# Altium PCB 0060631C.PcbDoc (part 3 of 7)
Units mil, origin at the board's own origin, x right, y up, seen from the top; angles counter-clockwise.
Board outline 5480 x 8249 mil, 6 copper layers (Top Layer, Mid-Layer 1, Mid-Layer 2, Internal Plane 1, Internal Plane 2, Bottom Layer); 514 components, 269 nets, 1375 pads, 1334 vias.
Unrouted connection lines stored in the file: 126.
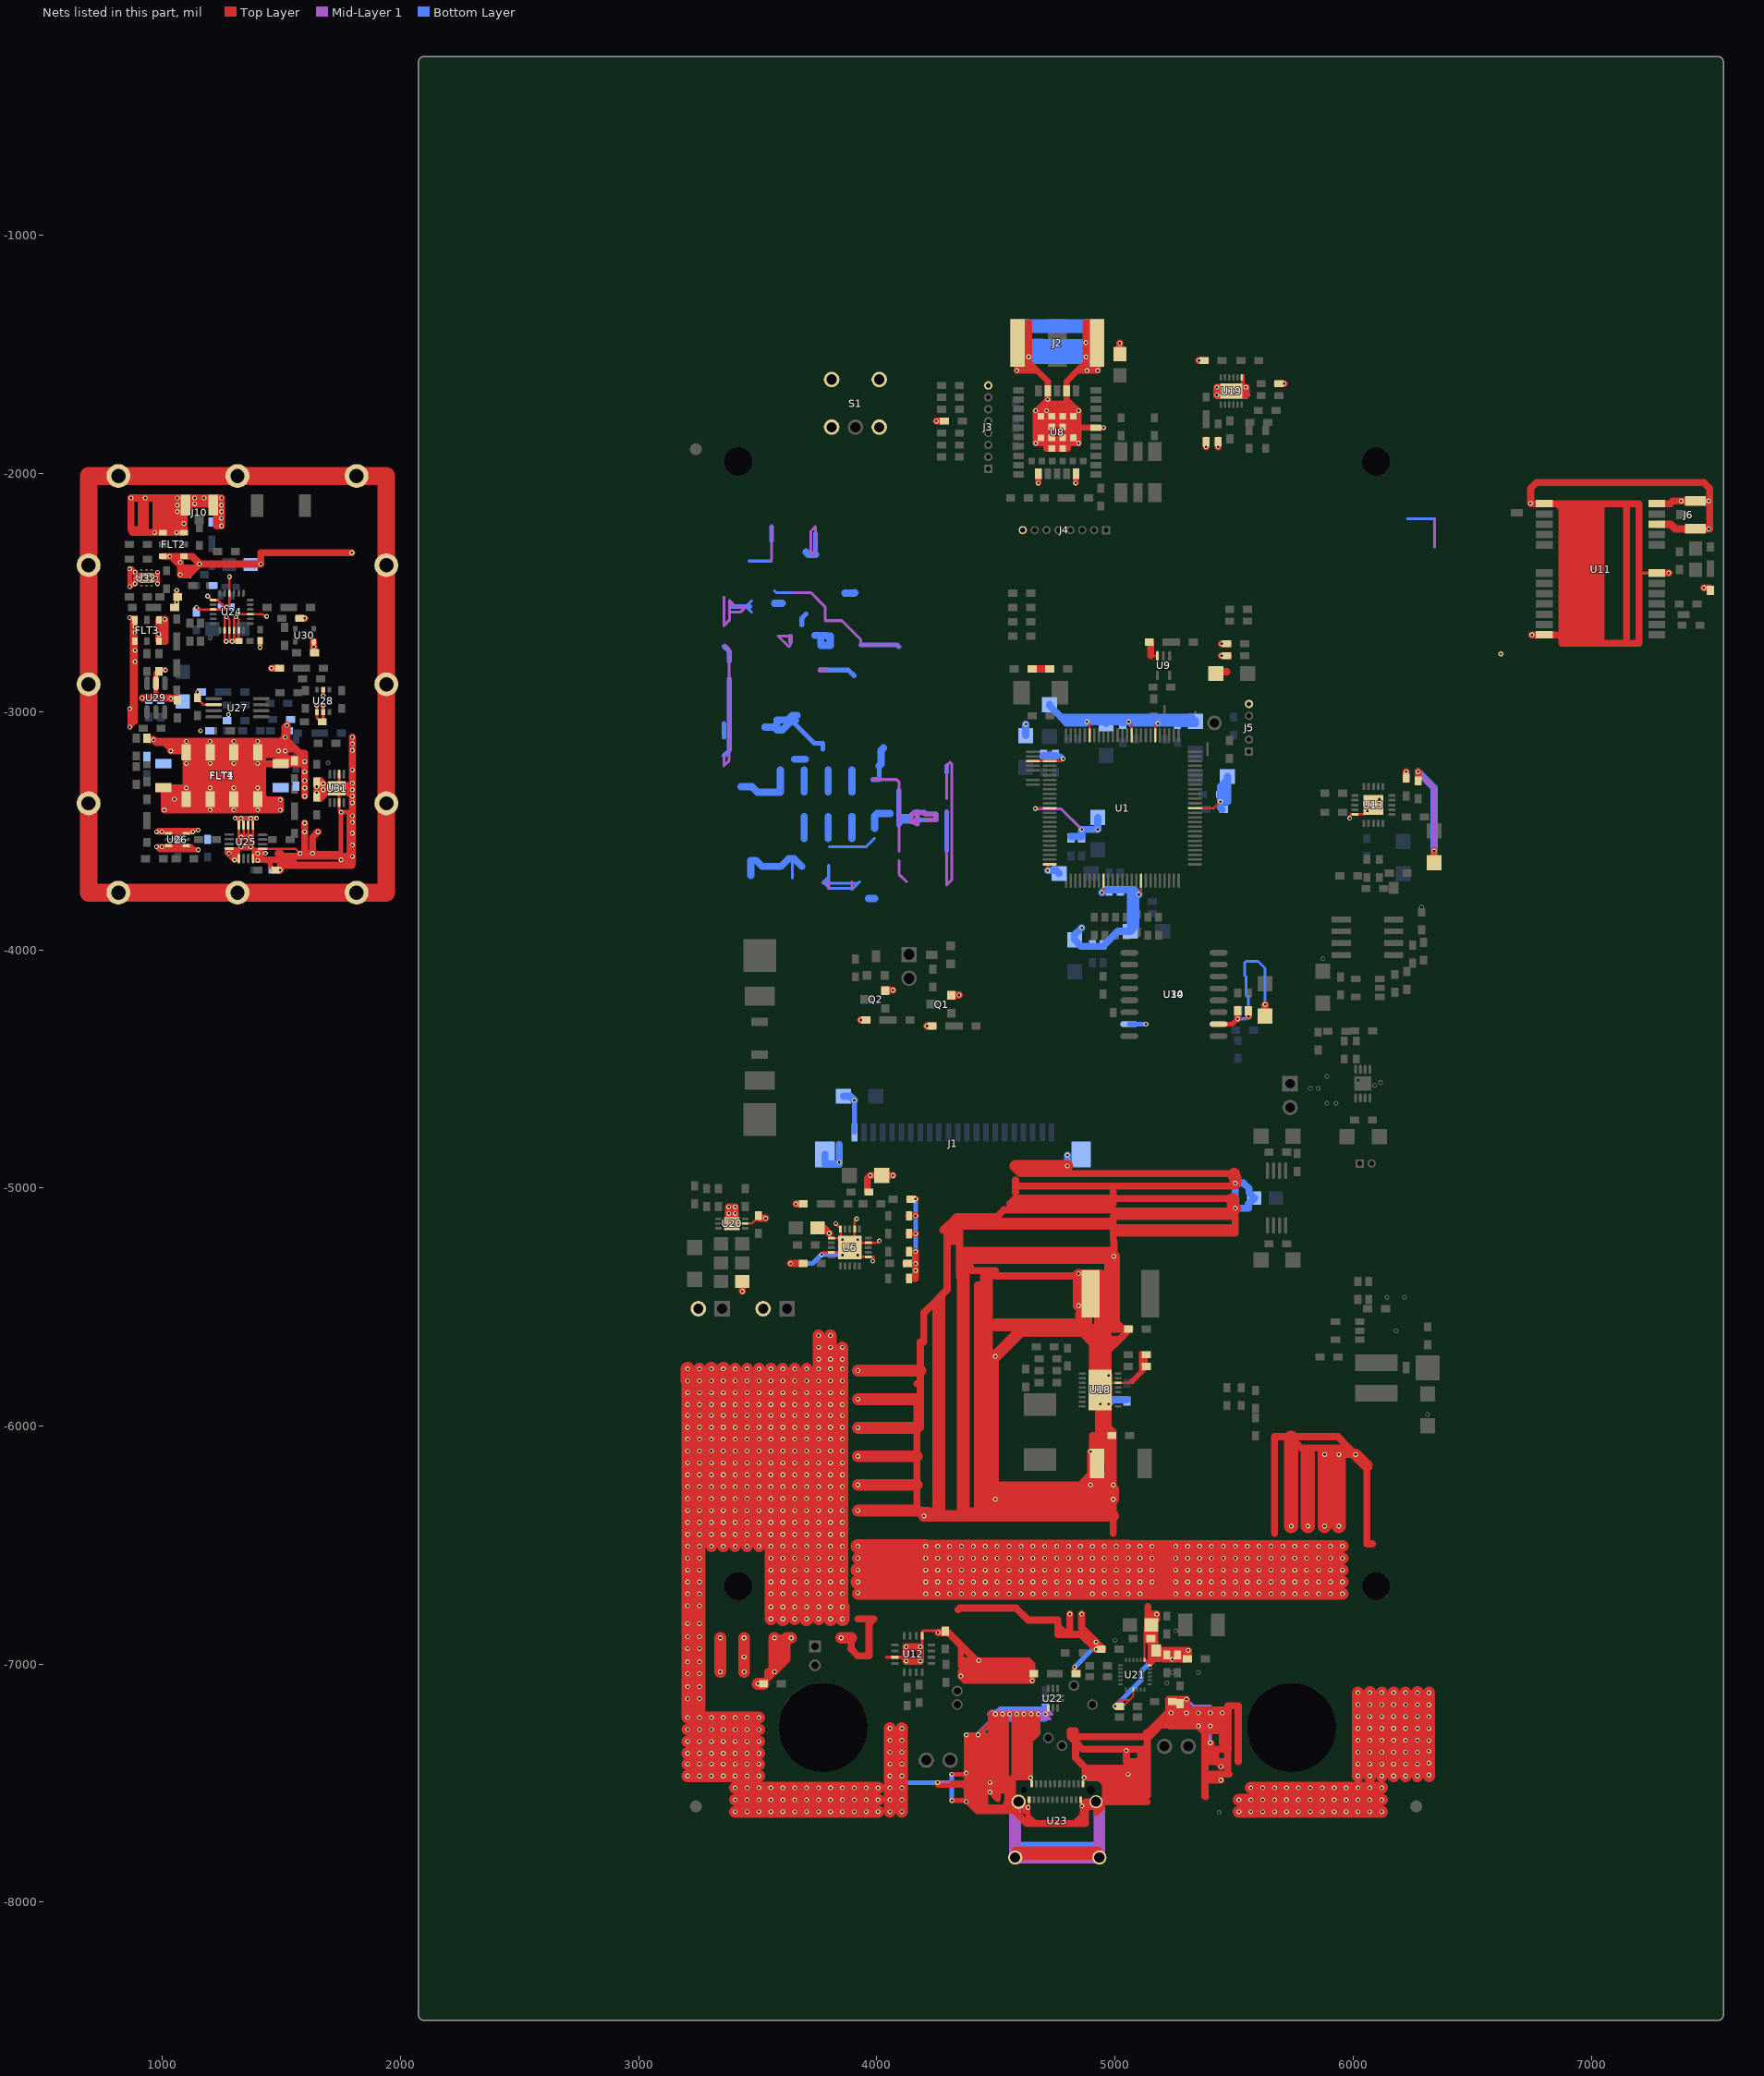
[diagram p7: the nets of this part, all layers, seen from the top]

## Via types
v1: diameter 20, hole 10, Top Layer to Bottom Layer, 1334 vias

## Nets (pads, with @x,y where several pads share a name; then routed paths per layer and width w, separated by ;. In a path a pad name is that pad's centre, name@x,y a point inside that pad or via, vN(x,y) a via of type N, cw(c..) or ccw(c..) an arc to the next point about the centre after c; other vN are vias at no path point) (continued)
GND: C1.2 C2.2 C3.2 C4.2 C5.2 C6.2 C7.2 C8.2 C9.2 C10.2 C11.2 C12.2 C13.2 C14.2 C15.2 C16.2 C17.2 C18.2 C19.2 C20.2 C21.2 C22.2 C23.2 C24.2 C25.2 C26.2 C27.2 C28.2 C29.2 C30.2 C31.2 C32.2 C33.2 C34.2 C35.2 C36.2 C37.2 C38.2 C39.2 C40.2 C41.2 C47.2 C57.2 C59.2 C62.2 C63.2 C64.2 C65.2 C66.2 C67.2 C69.2 C70.2 C71.2 C72.2 C73.2 C74.2 C75.2 C76.2 C78.2 C79.2 C81.1 C82.2 C83.2 C84.2 C88.2 C92.2 C96.2 C97.1 C98.2 C100.2 C101.1 C102.1 C103.1 C104.2 C105.2 C108.1 C110.2 C111.1 C112.1 C113.1 C116.2 C117.2 C118.2 C119.2 C120.2 C121.2 C122.2 C123.2 C124.2 C129.2 C130.2 C131.2 D1.2 D7.2 FLT1.1 FLT1.2 FLT1.3 FLT1.4 FLT1.6 FLT1.7 FLT1.8 FLT1.9 FLT1.10 FLT1.12 FLT2.1 FLT2.3 FLT2.4 FLT2.6 FLT3.1 FLT3.3 FLT3.4 FLT3.6 FLT4.1 FLT4.2 FLT4.3 FLT4.4 FLT4.6 FLT4.7 FLT4.8 FLT4.9 FLT4.10 FLT4.12 J1.22 J1.23 J1.24 J2.2 J2.3 J2.4 J2.5 J3.8 J4.8 J5.5 J6.2 J6.3 J8.2 J9.2 J10.2 J10.3 L4.2 Q1.2 Q2.2 R4.2 R7.2 R20.2 R24.1 R27.2 R58.2 R64.2 R65.2 R68.2 R76.2 R78.2 R79.2 R87.2 R98.1 R99.1 R104.1 R107.2 R109.2 R113.2 R118.2 R126.2 R127.1 S1.1 S1.3 S1.4 S1.5 TestPoint1.TestPoint1 TestPoint2.TestPoint2 TestPoint3.TestPoint3 TestPoint4.TestPoint4 TestPoint5.TestPoint5 TestPoint6.TestPoint6 TestPoint7.TestPoint7 TestPoint8.TestPoint8 TestPoint9.TestPoint9 TestPoint10.TestPoint10 TestPoint11.TestPoint11 TestPoint12.TestPoint12 TP5.1 TP15.1 U1.13 U1.31 U1.36 U1.45 U1.53 U1.63 U1.75 U1.84 U1.92 U2.2 U3.2 U4.2 U5.2 U6.1 U6.4 U6.11 U6.14 U6.17 U6.20 U6.21 U8.6 U8.12 U8.14 U8.26 U8.30 U8.37 U8.38 U8.39 U8.40 U8.41 U8.42 U8.43 U8.44 U8.45 U8.46 U8.47 U8.48 U9.3 U10.10 U11.7 U11.10 U11.12 U11.13 U11.24 U12.3 U12.13 U13.5 U13.21 U18.6 U18.17 U19.1 U19.13 U20.2 U20.7 U21.9 U21.18 U21.19 U22.8 U23.A1 U23.A12 U23.B1 U23.B12 U23.S1 U23.S2 U23.S3 U23.S4 U24.1 U24.3 U24.8 U24.9 U24.10 U24.11 U24.15 U24.22 U25.1 U25.5 U25.6 U25.7 U25.8 U25.12 U25.13 U25.16 U26.1 U26.3 U26.4 U26.6 U26.7 U27.2 U28.1 U28.2 U28.5 U29.2 U30.2 U31.3 U31.6 U31.9 U32.7 U34.10 ~FV23.FV ~FV24.FV ~FV25.FV ~FV26.FV ~FV27.FV ~FV28.FV ~FV29.FV ~FV30.FV ~FV31.FV ~FV32.FV ~FV33.FV ~FV34.FV ~FV35.FV ~FV36.FV ~FV37.FV ~FV38.FV ~FV39.FV ~FV40.FV ~FV41.FV ~FV42.FV ~FV43.FV ~FV44.FV ~FV45.FV ~FV46.FV ~FV47.FV ~FV48.FV ~FV49.FV ~FV50.FV ~FV51.FV ~FV52.FV ~FV53.FV ~FV54.FV ~FV55.FV ~FV56.FV ~FV57.FV ~FV58.FV ~FV59.FV ~FV60.FV ~FV61.FV ~FV62.FV ~FV63.FV ~FV64.FV ~FV65.FV ~FV66.FV ~FV67.FV ~FV68.FV ~FV69.FV ~FV70.FV ~FV71.FV ~FV72.FV ~FV73.FV ~FV74.FV ~FV75.FV ~FV76.FV ~FV77.FV ~FV78.FV ~FV79.FV ~FV80.FV ~FV81.FV ~FV82.FV ~FV83.FV ~FV84.FV ~FV85.FV ~FV86.FV ~FV87.FV ~FV88.FV ~FV89.FV ~FV90.FV ~FV91.FV ~FV92.FV ~FV93.FV ~FV94.FV ~FV95.FV ~FV96.FV ~FV97.FV ~FV98.FV ~FV99.FV ~FV100.FV ~FV101.FV ~FV102.FV ~FV103.FV ~FV104.FV ~FV105.FV ~FV106.FV ~FV107.FV ~FV108.FV ~FV109.FV ~FV110.FV ~FV111.FV ~FV112.FV ~FV113.FV ~FV114.FV ~FV117.FV ~FV118.FV ~FV119.FV ~FV120.FV ~FV121.FV | length 158276.6
  Top Layer w7: U21.9@5076.6,-7106.6 5076.6,-7136.1 5062.5,-7150.2 ; C67.2@5137.5,-6850.2 5123.9,-6863.8 5123.9,-6911.3 ; C66.2@5145,-6892.7 5142.5,-6892.7 5137.5,-6897.7 5123.9,-6911.3 ; U21.18@5146.5,-7005.2 5152.5,-7005.2 5158.7,-6999 ; C67.2@5162.5,-6845.2 5177.5,-6860.2 5177.5,-6905.2 5180,-6907.7 TP15.1@5180,-6934.1 ; 5167.5,-6980.2 5167.5,-6990.2 5161.3,-6996.4 ; TP15.1@5172.5,-6942.7 5174.8,-6939.3 TP15.1@5180,-6934.1 ; TP15.1@5177.5,-6942.7 5180,-6938.5 TP15.1@5185,-6930.2 ; 5190,-6980.2 5190,-6955.2 5190,-6942.7 5190,-6917.7 5185,-6924.8 TP15.1@5185,-6930.2 ; 5196.2,-6986.4 5217.5,-6986.4 ; C69.2@5220,-6965.2 5217.5,-6967.7 5217.5,-6981.5 ; v1(5240,-6980.2) C70.2@5265,-6980.2 ; C70.2@5260,-6965.2 5265,-6970.2 C70.2@5265,-6980.2 ; C73.2@5307.5,-6967.7 5307.5,-6972.7 C73.2@5298.7,-6981.5 ; C73.2@5310,-6977.7 5297.5,-6990.2 C73.2@5290,-6990.2 ; 5062.5,-7150.2 5015,-7150.2 5015,-7167.7 5025,-7177.7 5035,-7177.7 5062.5,-7150.2 ; U21.19@5123.9,-6976.6 5143.7,-6996.4 ; U21.19@5123.9,-6976.6 5123.9,-6911.3 ; U21.19@5123.9,-6976.6 U21.19@5123.9,-6982.6 5123.9,-6984.1 5138.8,-6999 5143.7,-6999 ; 5143.7,-6999 5158.7,-6999 ; 5143.7,-6999 5143.7,-6996.4 ; 5143.7,-6996.4 5161.3,-6996.4 ; 5158.7,-6999 5161.3,-6996.4 ; TP15.1@5180,-6934.1 5183.9,-6930.2 TP15.1@5185,-6930.2 ; 5217.5,-6990.2 5265,-6990.2 ; 5217.5,-6990.2 5217.5,-6986.4 ; 5217.5,-6990.2 5198.7,-6990.2 5190,-6981.5 5217.5,-6981.5 ; 5217.5,-6986.4 5217.5,-6981.5 ; 5217.5,-6981.5 5265,-6981.5 ; 5265,-6990.2 5265,-6981.5 ; 5265,-6990.2 C73.2@5290,-6990.2 ; 5265,-6981.5 C70.2@5265,-6980.2 ; 5265,-6981.5 C73.2@5298.7,-6981.5 ; C73.2@5290,-6990.2 C73.2@5298.7,-6981.5
  Top Layer w9: U18.17@4937.4,-5848.6 4947.4,-5838.6 4966.9,-5819.1 4969.9,-5819.1 U18.6@5012.4,-5819.1 5055.8,-5819.1 ; R65.2@5120,-5745 R64.2@5120,-5705 ; U19.13@5532.5,-1637.5 U19.1@5532.5,-1596 5532.5,-1587.5 5540,-1587.5 ~FV76.FV@5540,-1637.5 ; 5055.8,-5819.1 5065.8,-5819.1 ; 5055.8,-5819.1 5097.4,-5777.5 5097.5,-5777.5 5104.9,-5770.1 ; 5065.8,-5819.1 5075.9,-5819.1 5132.5,-5762.5 R65.2@5132.5,-5752.4 ; 5065.8,-5819.1 5104.9,-5780 ; 5104.9,-5780 5128.7,-5756.2 5126.58,-5752.64 R65.2@5125,-5750 ; 5104.9,-5780 5104.9,-5770.1 ; 5104.9,-5770.1 5104.9,-5690 5115,-5690 5125,-5700 R64.2@5126.3,-5701.3 ; 5104.9,-5770.1 R65.2@5125,-5750 ; R65.2@5125,-5750 5130.44,-5751.74 R65.2@5132.5,-5752.4 ; R65.2@5125,-5750 5125,-5702.6 R64.2@5126.3,-5701.3 ; R64.2@5126.3,-5701.3 5132.5,-5707.5 R65.2@5132.5,-5752.4
  Top Layer w10: v1(1142.5,-2562.5) 1150.7,-2570.7 U24.3@1212.5,-2570.7 1259.8,-2570.7 v1(1269,-2561.5) ; C118.2@1147.5,-2947.5 1170.6,-2970.6 U27.2@1215,-2970.6 ; v1(1190,-2515) 1206.3,-2531.3 U24.1@1212.5,-2531.3 1232.3,-2531.3 1262.5,-2561.5 v1(1269,-2561.5) ; v1(1281.5,-2433.5) 1280.8,-2434.2 U24.22@1280.8,-2502.5 1280.8,-2549.7 v1(1269,-2561.5) ; 1312.5,-3626.8 1312.5,-3585 ; C121.2@1320.3,-2702.5 C121.2@1320.2,-2702.4 ; U25.13@1320.7,-3616.9 1320.7,-3585 ; 1340.4,-3527.5 1340.4,-3517.1 ; ~FV41.FV@1360.1,-3527.5 1360.1,-3517.6 ; v1@1360.1,-3447.6 U25.6@1360.1,-3476.5 1360.1,-3517.6 ; v1(1370,-3447.5) 1379.8,-3457.3 U25.5@1379.8,-3476.5 1379.8,-3517.7 ; 1408.2,-3583.1 1410,-3585 ; 1410,-3625 1415,-3620 1415,-3595 ; 1420.6,-3624.4 1420.6,-3612.5 ; v1(1432.5,-3595) 1420.6,-3595 ; v1(1437.5,-2600) 1430,-2600 1420.4,-2590.4 U24.15@1368.8,-2590.4 1320.1,-2590.4 v1(1309,-2601.5) ; 1484.9,-3595 1484.9,-3581.2 1480,-3576.3 ; 1495,-3612.5 1420.6,-3612.5 ; 1495,-3595 1496.2,-3593.8 1496.2,-3576.3 ; ~FV85.FV@1577.5,-3595 1558.8,-3576.3 1496.2,-3576.3 ; U20.7@3391.3,-5150.3 U20.2@3447.5,-5150.3 3474.7,-5150.3 C64.2@3502.5,-5122.5 ; v1(3767.5,-5280) 3777.4,-5270.1 U6.4@3809,-5270.1 3855,-5270.1 3866.7,-5270.1 U6.21@3886.4,-5250.4 ; v1(3800,-5190) 3800,-5202 U6.1@3809,-5211 U6.21@3847,-5211 ; v1(3827.5,-5150) 3847,-5169.5 U6.20@3847,-5173 U6.21@3847,-5211 ; ~FV46.FV@3855,-5217.5 U6.21@3847,-5211 ; v1(3915,-5130) 3906.1,-5138.9 U6.17@3906.1,-5173 3906.1,-5217.5 U6.21@3906.1,-5230.7 ; v1(3920,-5282.5) 3927.3,-5289.8 U6.11@3963.8,-5289.8 3984.8,-5289.8 3984.8,-5305.2 v1(3982.5,-5307.5) ; v1(4010,-5222.5) 4001.8,-5230.7 U6.14@3963.8,-5230.7 3906.8,-5230.7 U6.21@3906.1,-5230.7 ; v1(4635,-7602) 4639.3,-7597.7 U23.B12@4639.3,-7569.9 ; v1(4645.5,-7477.5) 4649.2,-7481.2 U23.A1@4649.2,-7503 ; TP5.1@4655.5,-3207.6 U1.53@4725.6,-3207.6 4772.4,-3207.6 v1(4782.5,-3197.5) ; v1(4665,-3407.5) 4667.9,-3404.6 U1.63@4725.6,-3404.6 ; v1(4707.6,-7210.1) 4712.6,-7210.1 4719.2,-7203.5 U22.8@4719.2,-7184.2 ; v1(4717.5,-3667.5) 4717.5,-3649.1 U1.75@4725.6,-3641 ; U23.B1@4856,-7569.9 4856,-7590.5 v1(4861,-7595.5) ; U23.A12@4865.9,-7503 4865.9,-7481.1 v1(4870,-7477) ; v1(4882.5,-3042.5) 4892.7,-3052.7 U1.45@4892.7,-3099.6 ; v1(4945,-3760) 4951.8,-3753.2 U1.84@4951.8,-3709.6 ; v1(5057.5,-3042.5) 5070,-3055 U1.36@5070,-3099.6 ; v1(5100,-3767.5) 5109.4,-3758.1 U1.92@5109.4,-3709.6 ; U1.31@5168.5,-3099.6 5168.5,-3061.5 v1(5180,-3050) ; U1.13@5335.6,-3404.6 5415.4,-3404.6 v1(5442.5,-3377.5) ; v1(5985,-3447.5) 5985,-3437.5 5991.2,-3431.3 U13.5@6007.5,-3431.3 U13.21@6045.5,-3431.3 ; v1(6060,-3417.5) 6046.2,-3431.3 U13.21@6045.5,-3431.3 ; U13.21@6084.9,-3391.9 6084.4,-3392.4 U13.21@6045.5,-3431.3 ; 1272.5,-3602.5 ~FV95.FV@1292.5,-3622.5 ; 1272.5,-3602.5 U25.12@1272.5,-3575 ; 1272.5,-3602.5 1265,-3595 1265,-3575 U25.12@1272.5,-3575 ; U25.12@1272.5,-3575 U25.12@1280,-3575 ; U25.12@1280,-3575 v1(1280,-3595) 1292.5,-3595 ; U25.12@1280,-3575 1285,-3577.5 1292.5,-3585 ; U25.12@1280,-3575 U25.12@1287.5,-3575 ; U25.12@1287.5,-3575 1292.5,-3580 1292.5,-3585 ; U25.12@1287.5,-3575 1310.7,-3575 ; ~FV95.FV@1292.5,-3622.5 1292.5,-3612.5 ; ~FV95.FV@1292.5,-3622.5 v1(1302.5,-3622.5) 1292.5,-3612.5 ; 1292.5,-3612.5 1292.5,-3595 ; 1292.5,-3595 1292.5,-3585 ; 1292.5,-3595 1302.5,-3595 ; 1292.5,-3585 1295,-3582.5 1307.6,-3582.5 1310.1,-3585 1310.7,-3584.2 1310.7,-3575 ; 1292.5,-3585 1302.5,-3595 ; v1(1292.5,-2705) 1317.8,-2705 C121.2@1320.2,-2702.4 ; v1(1292.5,-2705) v1(1267.5,-2705) 1261.1,-2698.6 U24.8@1261.1,-2658.7 1261.1,-2609.4 v1(1269,-2601.5) 1280.8,-2613.3 U24.9@1280.8,-2658.7 1280.8,-2693.3 v1(1292.5,-2705) ; v1(1292.5,-2705) 1300.5,-2697 U24.10@1300.5,-2658.7 1300.5,-2610 v1(1309,-2601.5) ; 1302.5,-3595 1312.5,-3585 ; v1(1309,-2601.5) 1320.2,-2612.7 U24.11@1320.2,-2658.7 C121.2@1320.2,-2702.4 ; 1310.7,-3575 1320.7,-3585 ; 1312.5,-3585 1320.7,-3585 ; 1320.7,-3585 1320.7,-3518.2 ; 1320.7,-3518.2 v1(1330,-3527.5) 1340.4,-3517.1 ; 1320.7,-3518.2 U25.8@1320.7,-3476.5 1320.7,-3456.8 v1(1330,-3447.5) 1340.4,-3457.9 U25.7@1340.4,-3476.5 1340.4,-3517.1 ; 1360.1,-3517.6 ~FV41.FV@1370,-3527.5 1379.8,-3517.7 ; 1379.8,-3585 1379.8,-3517.7 ; 1379.8,-3585 U25.16@1379.8,-3616.9 1379.8,-3622.3 1387.4,-3629.9 ; 1379.8,-3585 1387.4,-3577.4 ; 1387.4,-3629.9 1387.4,-3577.4 ; 1387.4,-3629.9 1387.5,-3630 1395,-3630 v1(1400,-3625) ; 1387.4,-3577.4 1388.5,-3576.3 1395,-3576.3 ; 1395,-3576.3 1395,-3620 v1(1400,-3625) ; 1395,-3576.3 1400,-3576.3 ; v1(1400,-3625) v1(1400,-3595) ; v1(1400,-3625) 1407.5,-3622.5 1407.5,-3602.5 v1(1400,-3595) ; v1(1400,-3595) 1400,-3576.3 ; v1(1400,-3595) 1415,-3595 ; v1(1400,-3595) 1410,-3585 ; 1400,-3576.3 U25.1@1415,-3576.3 ; 1410,-3585 1410,-3581.3 U25.1@1415,-3576.3 ; 1415,-3595 1420.6,-3595 ; U25.1@1415,-3576.3 U25.1@1420.6,-3576.3 ; 1420.6,-3612.5 1420.6,-3595 ; 1420.6,-3595 U25.1@1420.6,-3576.3 ; U25.1@1420.6,-3576.3 1480,-3576.3 ; 1480,-3576.3 1496.2,-3576.3 ; U6.21@3847,-5211 3855,-5219 U6.21@3886.4,-5250.4 ; U6.21@3886.4,-5250.4 U6.21@3906.1,-5230.7
  Top Layer w12: v1(975,-3567.5) 980,-3562.5 ~FV43.FV@1002.5,-3562.5 ; v1(975,-3505) 980.5,-3510.5 U26.4@1025,-3510.5 1062.5,-3510.5 U26.3@1100,-3510.5 1122,-3510.5 v1(1127.5,-3505) 1135,-3497.5 ; U26.7@1062.5,-3536.5 1062.5,-3562.5 ; v1@1140,-3580 1130,-3570 ; v1(1647.5,-2972.5) 1649,-2974 U28.1@1649,-3001.7 1649,-3026.5 1665,-3042.5 1675,-3032.5 U28.2@1675,-3001.7 v1(1675,-2972.5) ; v1(1675,-2932.5) U28.5@1675,-2907.5 ; U31.6@1742.1,-3262.7 1742.1,-3310 1742.1,-3320.4 1742.1,-3324.6 U31.9@1742.1,-3334.6 ; ~FV40.FV@1750,-3422.5 1742.1,-3414.6 U31.3@1742.1,-3382.5 U31.9@1742.1,-3335 ; v1(3655,-5760) v1@3655,-5755 ; Q2.2@4035,-4182.5 Q2.2@4047.5,-4170 ; 4040,-6972.5 4041.2,-6971.3 U12.3@4075.7,-6971.3 4106.3,-6971.3 ~FV120.FV@4122.5,-6987.5 ; ~FV48.FV@4182.5,-6927.5 4190.6,-6919.4 U12.13@4190.6,-6882 4190.6,-6864.4 4195,-6860 4250,-6860 v1(4257.5,-6867.5) ; Q1.2@4312.5,-4202.5 Q1.2@4325,-4190 ; R65.2@5125,-5750 5120,-5745 5112.5,-5737.5 5112.5,-5712.5 5120,-5705 R64.2@5125,-5700 ; 5150,-2765 5150.5,-2765.5 U9.3@5177.5,-2765.5 ; v1@5567.84,-7520 v1(5570,-7520) ; 7200.2,-2417.7 U11.7@7275,-2417.7 ; ~FV43.FV@1002.5,-3562.5 ~FV43.FV@997.5,-3567.5 1000,-3570 1100,-3570 1130,-3570 ; ~FV43.FV@1002.5,-3562.5 U26.6@1025,-3562.5 1062.5,-3562.5 ; 1062.5,-3562.5 U26.1@1100,-3562.5 1122.5,-3562.5 1130,-3570 ; U31.9@1742.1,-3335 U31.9@1742.1,-3334.6 ; U31.9@1742.1,-3335 1742.5,-3335 U31.9@1742.1,-3334.6
  Top Layer w20: v1(862.5,-2987.5) v1(862.5,-3065) 873.7,-3053.8 ; v1(862.5,-2605) 870,-2605 FLT3.3@873.7,-2608.7 ; FLT3.3@885,-2615 FLT3.3@885,-2620 ; v1(885.5,-2462.5) v1@885.5,-2454.5 ; v1(970,-2942.5) 972.5,-2940 U29.2@972.5,-2880.5 972.5,-2837.5 985,-2825 v1(1012.5,-2825) ; v1(972,-2438.5) v1(945.5,-2438.5) U32.7@932.5,-2438.5 ; v1(975,-3567.5) 987.5,-3580 1140,-3580 v1(1150,-3580) ; v1(975,-3505) 982.5,-3497.5 1062.5,-3497.5 ; v1(979.5,-2462.5) 979.5,-2455.5 974,-2450 ; v1(979.5,-2414.5) 979.5,-2420.5 973,-2427 ; C108.1@1057.5,-2562.5 1060,-2560 ~FV32.FV@1060,-2540 C129.2@1060,-2515 ; C129.2@1057.5,-2517.5 C129.2@1060,-2515 ; v1(1060,-2490) C129.2@1060,-2515 ; U26.7@1062.5,-3536.5 1062.5,-3510.5 1062.5,-3497.5 ; C118.2@1147.5,-2947.5 C118.2@1147.5,-2941.5 v1(1147.5,-2917.5) ; v1(1150,-3497.5) 1135,-3497.5 1062.5,-3497.5 ; v1(1302.5,-3622.5) 1302.5,-3595 ; v1(1305,-3447.5) v1@1320.7,-3447.5 ; U25.8@1320.7,-3456.8 v1@1320.7,-3447.5 ; v1@1360.1,-3447.6 v1@1360,-3447.5 ; v1(1395,-3447.5) v1(1370,-3447.5) v1@1360,-3447.5 ; v1(1400,-3625) 1410,-3625 1420,-3625 ; v1(1410,-2730) R118.2@1410,-2702.2 ; 1420.6,-3624.4 1420,-3625 ; C120.2@1470,-3665 1452.5,-3647.5 1452.5,-3637.5 1440,-3625 ; 1552.5,-3607.5 1552.5,-3625 1497.5,-3625 1495,-3622.5 1492.5,-3625 1440,-3625 ; ~FV85.FV@1577.5,-3595 1597.5,-3595 1615,-3595 v1(1630,-3595) 1750,-3595 ; 1797.5,-3620 1795,-3622.5 ~FV96.FV@1750,-3622.5 1750,-3607.5 1750,-3595 ; 1797.5,-3590 1782.5,-3590 1782.5,-3465 1782.5,-3422.5 ; v1(1797.5,-3437.5) 1782.5,-3422.5 ; 1797.5,-3422.5 1782.5,-3422.5 ; 4255,-7510 4362.5,-7510 4375,-7522.5 ; v1(4315,-7572.5) 4372.5,-7572.5 v1@4375,-7575 ; 4315,-7497.5 4375,-7497.5 ; v1(4315,-7462.5) 4370,-7462.5 v1(4375,-7457.5) ; v1(4375,-7577.5) v1@4375,-7575 ; 4562.5,-7477.5 4562.5,-7578.2 ; 4579.5,-7619.5 4419.5,-7619.5 4400,-7600 ; 4617.5,-7619.5 4635,-7619.5 ; 4665,-7669.5 4665,-7667 ; v1(4830,-7012.5) 4830,-7027.5 R98.1@4842.5,-7040 ; v1(4861,-7595.5) 4861,-7633.5 4827.5,-7667 ; 4876.3,-7639.5 4848.8,-7667 4827.5,-7667 ; U8.6@4919.5,-1807.2 4952.2,-1807.2 v1(4952.5,-1807.5) ; v1(5000,-7177.7) C74.2@5019,-7177.7 C74.2@5025,-7177.7 ; 5162.5,-6980.2 5167.5,-6980.2 5177.5,-6980.2 ; TP15.1@5177.5,-6942.7 5177.5,-6980.2 ; 5190,-6980.2 5177.5,-6980.2 ; U10.10@5435,-4312.5 5492.5,-4312.5 v1(5515,-4290) ; 872,-2407 ~FV83.FV@885.5,-2420.5 ; 872,-2407 872,-2400.5 ~FV83.FV@885.5,-2414 ~FV83.FV@885.5,-2420.5 ; 872,-2407 865,-2400 v1(862.5,-2400) v1(862.5,-2475) 865,-2475 v1@885.5,-2454.5 ; 873.7,-3053.8 873.7,-2742.5 873.7,-2667.5 FLT3.3@873.7,-2608.7 ; 873.7,-3053.8 885,-3042.5 ~FV34.FV@885,-2790 v1(885,-2742.5) FLT3.4@885,-2703.5 v1(885,-2667.5) ~FV33.FV@885,-2642.5 FLT3.3@885,-2620 ; FLT3.3@873.7,-2608.7 FLT3.3@885,-2620 ; v1@885.5,-2454.5 885.5,-2438.5 v1(893,-2438.5) v1(919.5,-2438.5) U32.7@932.5,-2438.5 ; v1@885.5,-2454.5 890,-2450 919.5,-2450 U32.7@944,-2450 ; ~FV83.FV@885.5,-2420.5 892,-2427 932.5,-2427 U32.7@944,-2427 ; U32.7@932.5,-2438.5 U32.7@944,-2427 ; U32.7@932.5,-2438.5 U32.7@944,-2450 ; U32.7@944,-2450 972,-2450 974,-2450 ; U32.7@944,-2427 973,-2427 ; 973,-2427 979.5,-2427 979.5,-2450 974,-2450 ; v1@1320.7,-3447.5 v1(1330,-3447.5) v1@1360,-3447.5 ; 1420,-3625 1440,-3625 ; 1750,-3595 ~FV40.FV@1750,-3422.5 1782.5,-3422.5 ; v1@4375,-7575 4390,-7590 ; v1@4375,-7575 4375,-7522.5 ; 4375,-7522.5 4375,-7497.5 ; 4375,-7497.5 v1(4375,-7457.5) ; v1(4375,-7457.5) ~FV109.FV@4375,-7297.5 4390,-7297.5 ; 4390,-7590 4400,-7600 ; 4390,-7590 4390,-7582.5 4390,-7297.5 ; 4390,-7297.5 4407.5,-7297.5 ; 4400,-7600 4407.5,-7600 ; 4407.5,-7600 4407.5,-7297.5 ; 4407.5,-7600 4425,-7600 ; 4407.5,-7297.5 v1(4425,-7297.5) ; 4425,-7600 4440,-7600 ; 4425,-7600 v1(4425,-7297.5) ; v1(4425,-7297.5) 4440,-7297.5 ; v1(4425,-7297.5) 4475,-7247.5 ; 4440,-7600 4440,-7297.5 ; 4440,-7600 4457.5,-7600 ; 4440,-7297.5 4457.5,-7297.5 4457.5,-7600 ; 4457.5,-7600 4537.5,-7600 4545,-7592.5 4545,-7585 4545,-7535 ; 4475,-7247.5 4475,-7210 v1(4497.5,-7210) ; 4475,-7247.5 v1(4475,-7497.5) ~FV110.FV@4475,-7537.5 4505,-7567.5 4510,-7570 ; 4492.5,-7535 4492.5,-7215 v1(4497.5,-7210) ; 4492.5,-7535 4492.5,-7552.5 4510,-7570 ; 4492.5,-7535 4510,-7535 ; v1(4497.5,-7210) 4510,-7210 ; 4510,-7570 4510,-7535 ; 4510,-7535 4510,-7210 ; 4510,-7535 4527.5,-7535 ; 4510,-7210 v1(4527.5,-7210) ; 4527.5,-7535 4545,-7535 ; 4527.5,-7535 v1(4527.5,-7210) ; v1(4527.5,-7210) 4545,-7210 ; 4545,-7535 4545,-7210 ; 4545,-7210 v1(4557.5,-7210) 4575.5,-7210 ; 4562.5,-7578.2 4562.5,-7602 4618.7,-7602 ; 4562.5,-7578.2 U23.S1@4575,-7578.2 ; U23.S1@4575,-7578.2 4575,-7477.5 ; U23.S1@4575,-7578.2 U23.S1@4594.9,-7578.2 4618.7,-7602 ; 4575,-7477.5 4592.5,-7477.5 ; 4575,-7477.5 4575,-7210.5 4575.5,-7210 ; 4575.5,-7210 ~FV88.FV@4587.5,-7210 ; ~FV88.FV@4587.5,-7210 4607,-7210 ; ~FV88.FV@4587.5,-7210 4592.5,-7215 4592.5,-7477.5 ; 4592.5,-7477.5 4610,-7477.5 ; 4607,-7210 ~FV89.FV@4617.5,-7210 ; 4607,-7210 ~FV89.FV@4610,-7213 ; 4610,-7477.5 ~FV89.FV@4610,-7213 ; 4610,-7477.5 4627.5,-7477.5 ; ~FV89.FV@4610,-7213 ~FV89.FV@4617.5,-7210 ; ~FV89.FV@4617.5,-7210 4627.5,-7210 ; ~FV89.FV@4617.5,-7210 4627.5,-7220 ; 4618.7,-7602 v1(4635,-7602) 4635,-7619.5 ; 4627.5,-7477.5 4627.5,-7220 ; 4627.5,-7477.5 v1(4645.5,-7477.5) 4645.5,-7322 ; 4627.5,-7220 4627.5,-7210 ; 4627.5,-7210 v1@4645.5,-7210 ; 4635,-7637 4665,-7667 ; 4635,-7637 4635,-7667 4665,-7667 ; 4635,-7637 4635,-7619.5 ; 4645.5,-7322 v1@4645.5,-7210 ; 4645.5,-7322 4660,-7307.5 ; v1@4645.5,-7210 v1(4647.5,-7210) 4660,-7210 ; 4660,-7307.5 4660,-7210 ; 4660,-7307.5 4677.6,-7289.9 4677.6,-7210.1 v1(4677.5,-7210) 4660,-7210 ; 4665,-7667 4827.5,-7667
  Top Layer w25: 4352.5,-6920 4352.5,-6985 ; 4372.5,-6985 4352.5,-6985 ; ~FV93.FV@4427.5,-6985 4637.5,-6985 4652.6,-7000.1 4652.6,-7007.5 ; v1(4652.6,-7070.1) v1@4652.6,-7070 ; v1(4677.5,-2040) 4678.3,-2039.2 U8.26@4678.3,-2001.1 ; v1(4835,-2040) 4835.7,-2039.3 U8.30@4835.7,-2001.1 ; ~FV52.FV@4352.5,-7050 R99.1@4652.6,-7050 ; ~FV52.FV@4352.5,-7050 4352.5,-7027.5 R99.1@4652.6,-7027.5 ; ~FV52.FV@4352.5,-7050 4352.5,-7055 4367.5,-7070 v1@4652.6,-7070 ; 4352.5,-6985 4352.5,-7007.5 4652.6,-7007.5 ; v1@4652.6,-7070 R99.1@4652.6,-7050 ; R99.1@4652.6,-7050 R99.1@4652.6,-7027.5 ; R99.1@4652.6,-7027.5 4652.6,-7007.5
  Top Layer w26: J2.2@4590,-1522.5 J2.2@4587.5,-1525 ; J2.2@4590,-1452.5 J2.2@4602.5,-1465 ; J2.2@4602.5,-1510 4602.5,-1507.5 J2.2@4602.5,-1465 ; v1(4637.5,-1510) 4637.5,-1532.5 ; v1(4717.5,-1689) v1@4717.6,-1688.9 ; U8.42@4824.9,-1849.3 U8.41@4779.7,-1849.3 U8.40@4734.3,-1849.3 4689.1,-1849.3 U8.39@4689.1,-1849.9 4666.5,-1849.9 ; U8.48@4824.9,-1758.7 U8.47@4779.7,-1758.7 U8.46@4734.3,-1758.7 U8.45@4689.1,-1758.7 ; ~FV79.FV@4877.5,-1510 4877.5,-1532.5 4876.2,-1533.8 ; U8.6@4919.5,-1807.2 4919.5,-1807 4847.5,-1807 ; J2.3@4927.5,-1472.5 J2.3@4925.6,-1470.6 ; U18.17@4969.9,-5785 v1(4972.4,-5787.5) ; v1(4587.5,-1567.5) J2.2@4611.3,-1543.7 ; v1(4587.5,-1567.5) J2.2@4587.5,-1525 ; v1(4587.5,-1567.5) 4632.5,-1567.5 ; J2.2@4587.5,-1525 4589.6,-1464.6 4590,-1464.6 J2.2@4602.5,-1465 ; J2.2@4611.3,-1543.7 4611.3,-1543.8 4630,-1562.5 4637.5,-1562.5 ; J2.2@4611.3,-1543.7 4622.5,-1532.5 4637.5,-1532.5 ; 4632.5,-1567.5 4637.5,-1562.5 ; 4632.5,-1567.5 4672.5,-1567.5 ; 4637.5,-1562.5 4637.5,-1532.5 ; 4637.5,-1532.5 4672.5,-1567.5 ; 4666.5,-1849.9 4666.5,-1826.5 ; 4666.5,-1849.9 ~FV27.FV@4666.5,-1872.5 4711.5,-1872.5 ; 4666.5,-1826.5 4847.5,-1826.5 ; 4666.5,-1826.5 4666.5,-1803 ; 4666.5,-1803 4734.3,-1803 U8.43@4734.3,-1804 U8.44@4779.7,-1804 4847.5,-1804 ; 4666.5,-1803 4666.5,-1781.5 ; 4666.5,-1781.5 4847.5,-1781.5 ; 4666.5,-1781.5 4666.5,-1758.7 ; 4666.5,-1758.7 U8.45@4689.1,-1758.7 ; 4666.5,-1758.7 ~FV26.FV@4666.5,-1736 ~FV26.FV@4671,-1736 ; ~FV26.FV@4671,-1736 v1@4711.8,-1736 ; ~FV26.FV@4671,-1736 4704,-1703 ; 4672.5,-1567.5 4717.6,-1612.6 U8.14@4717.6,-1652.6 v1@4717.6,-1688.9 ; U8.45@4689.1,-1758.7 v1@4711.8,-1736 ; 4704,-1703 4704,-1728.2 v1@4711.8,-1736 ; 4704,-1703 v1@4717.6,-1689.4 ; 4711.5,-1872.5 4711.5,-1894.6 U8.37@4734.3,-1894.6 U8.38@4779.7,-1894.6 4802.5,-1894.6 4802.5,-1872.5 ; 4711.5,-1872.5 4802.5,-1872.5 ; v1@4711.8,-1736 4717.6,-1730.2 4717.6,-1717.5 ; v1@4711.8,-1736 v1(4712,-1736) 4802,-1736 ; 4717.6,-1717.5 4717.6,-1699.5 ; 4717.6,-1717.5 4723.6,-1717.5 ; 4717.6,-1699.5 4723.6,-1705.5 ; 4717.6,-1699.5 v1@4717.6,-1689.4 ; v1@4717.6,-1689.4 v1@4717.6,-1688.9 ; 4723.6,-1717.5 4793.4,-1717.5 4796.4,-1714.5 ; 4723.6,-1717.5 4723.6,-1705.5 ; 4723.6,-1705.5 4796.4,-1705.5 ; 4796.4,-1714.5 4796.4,-1730.4 4802,-1736 ; 4796.4,-1714.5 4796.4,-1705.5 ; 4796.4,-1705.5 4811,-1705.5 ; 4796.4,-1705.5 4796.4,-1688.9 ; 4796.4,-1688.9 U8.12@4796.4,-1652.6 4796.4,-1613.6 4842.5,-1567.5 ; 4796.4,-1688.9 4812,-1704.5 ; 4802,-1736 ~FV74.FV@4843.5,-1736 ; 4802,-1736 4802,-1714.5 4811,-1705.5 ; 4802.5,-1872.5 v1(4847.5,-1872.5) 4847.5,-1826.5 ; 4811,-1705.5 4812,-1704.5 ; 4812,-1704.5 ~FV74.FV@4843.5,-1736 ; 4842.5,-1567.5 4876.2,-1533.8 ; 4842.5,-1567.5 ~FV77.FV@4882.5,-1567.5 ; ~FV74.FV@4843.5,-1736 ~FV74.FV@4847.5,-1736 4847.5,-1781.5 ; 4847.5,-1826.5 4847.5,-1807 ; 4847.5,-1807 4847.5,-1804 ; 4847.5,-1804 4847.5,-1781.5 ; 4876.2,-1547.5 J2.3@4907.5,-1547.5 ; 4876.2,-1547.5 4876.2,-1533.8 ; 4876.2,-1547.5 4876.2,-1561.2 ~FV77.FV@4882.5,-1567.5 ; ~FV77.FV@4882.5,-1567.5 ~FV78.FV@4927.5,-1567.5 ; J2.3@4907.5,-1547.5 4911.6,-1525 4912.5,-1520.1 J2.3@4925,-1452.5 J2.3@4925.6,-1470.6 ; J2.3@4907.5,-1547.5 ~FV78.FV@4927.5,-1567.5 ; J2.3@4925.6,-1470.6 4925.7,-1472.5 4927.5,-1527.5 ~FV78.FV@4927.5,-1567.5